# Altium PCB ZYNQ_BOARD.PcbDoc (part 8 of 9)
Units mm, origin at the board's own origin, x right, y up, seen from the top; angles counter-clockwise.
Board outline 120 x 66 mm, 10 copper layers (Top Layer, Internal Plane 1 (GND), Middle Layer 1, Middle Layer 2, Internal Plane 2 (+1.0V), Middle Layer 3, Middle Layer 4, Middle Layer 5 (PWR), Internal Plane 3 (GND), Bottom Layer), stack 0.982 mm thick; 333 components, 331 nets, 1511 pads, 1077 vias.
Unrouted connection lines stored in the file: 30.
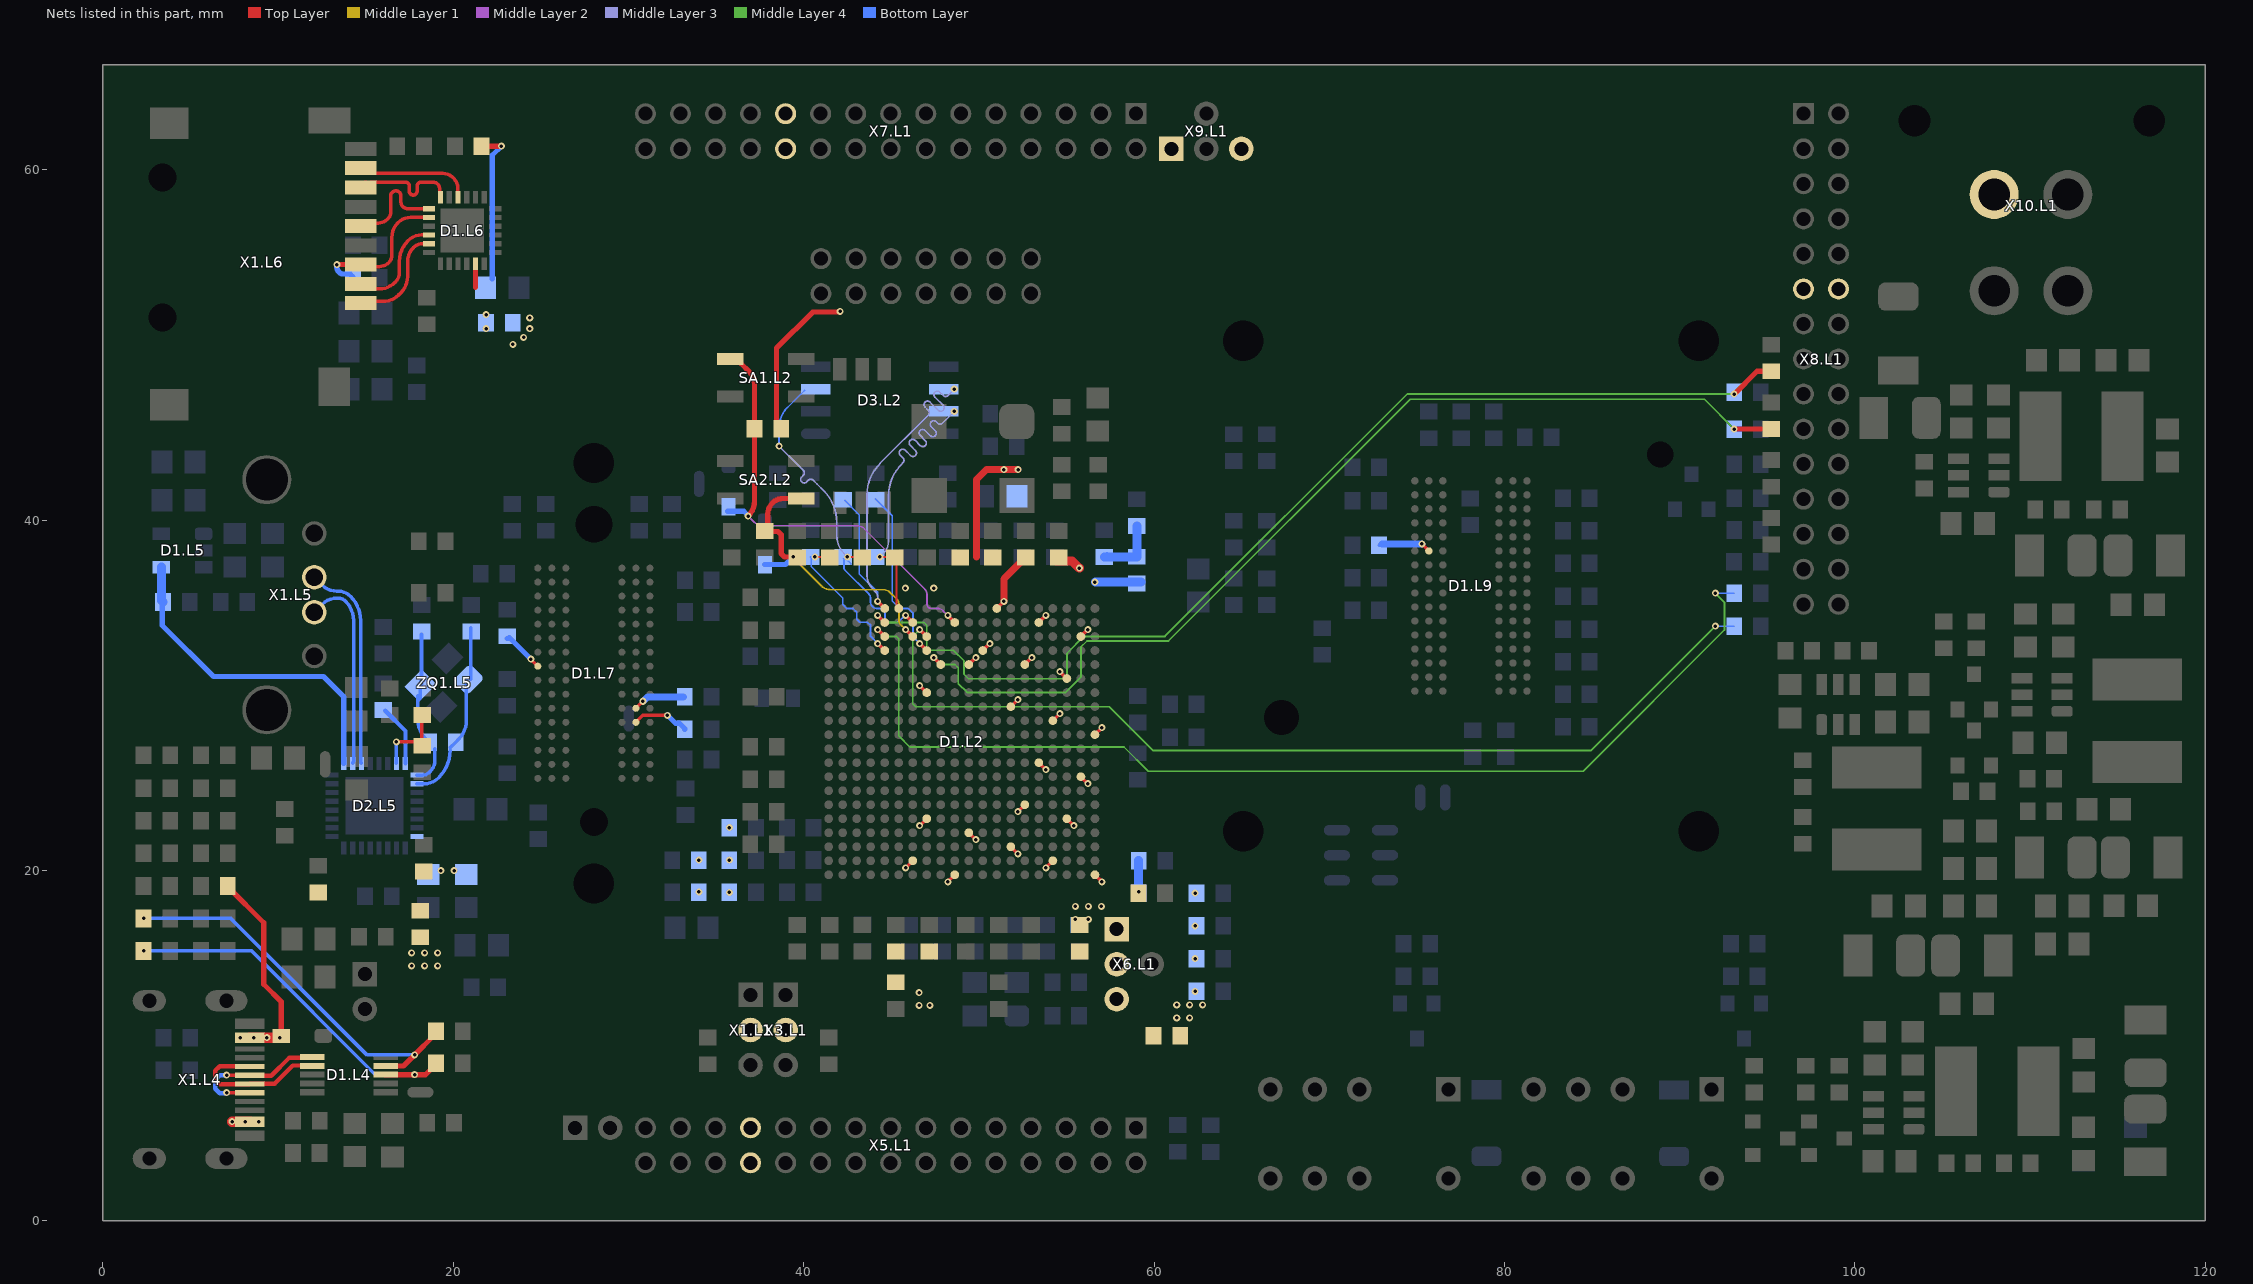
[diagram p16: the nets of this part, all layers, seen from the top]

## Via types
v1: diameter 0.4, hole 0.2, Top Layer to Bottom Layer, 1059 vias
v2: diameter 0.9, hole 0.6, Top Layer to Bottom Layer, 18 vias

## Nets (pads, with @x,y where several pads share a name; then routed paths per layer and width w, separated by ;. In a path a pad name is that pad's centre, name@x,y a point inside that pad or via, vN(x,y) a via of type N, cw(c..) or ccw(c..) an arc to the next point about the centre after c; other vN are vias at no path point) (continued)
PS_MIO4: D1.L2.B7 D3.L2.3 R21.L2.2 R25.L2.2 | length 20.2
  Top Layer w0.1: v1(42.49,37.9) R21.L2.2@43.35,37.9
  Top Layer w0.2: v1(45.82,34.56) D1.L2.B7@46.22,34.16
  Middle Layer 3 w0.1: v1(38.589,44.229) 39.658,43.16 39.976,42.842 cw(c39.834,42.701) 39.976,42.559 39.884,42.468 ccw(c40.026,42.326) 39.884,42.185 ccw(c40.026,42.326) 40.167,42.185 40.259,42.276 cw(c40.4,42.135) 40.542,42.276 40.754,42.064 41.143,41.675 cw(c39.347,39.879) 41.887,39.879 41.887,39.125 ccw(c43.387,39.125) 42.326,38.064 v1(42.49,37.9)
  Bottom Layer w0.1: v1@38.589,44.119 v1(38.589,44.229) 38.589,45.27 cw(c40.228,45.27) 39.069,46.429 D3.L2.3@40.04,47.4 ; R25.L2.2@42.25,37.8 42.4,37.8 R25.L2.2@42.7,37.5 ; R25.L2.2@42.3,37.7 42.3,37.28 ccw(c42.513,37.28) 42.362,37.129 43.73,35.762 cw(c43.524,35.555) 43.815,35.555 43.815,35.308 ccw(c44.138,35.308) 43.91,35.08 ccw(c44.2,35.37) 44.2,34.96 44.273,34.96 cw(c44.273,34.559) 44.556,34.843 ; 44.556,34.842 cw(c44.366,34.652) 44.635,34.652 ; 44.635,34.651 44.635,34.435 ccw(c44.925,34.435) 44.72,34.23 ccw(c44.889,34.399) 44.889,34.16 45.249,34.16 ccw(c45.249,34.459) 45.46,34.248 45.739,34.526 cw(c45.82,34.445) v1(45.82,34.56)
PS_MIO5: D1.L2.A6 D3.L2.7 R22.L2.2 R26.L2.2 | length 18.3
  Top Layer w0.1: v1(44.35,37.9) R22.L2.2@45.19,37.9 ; D1.L2.A6@45.29,34.92 R22.L2.2@45.29,37.85 ; D1.L2.A6@45.36,35.02 D1.L2.A6@45.42,34.96
  Middle Layer 3 w0.1: v1(44.35,37.9) 44.545,38.095 ccw(c43.832,38.808) 44.84,38.808 44.84,41.403 cw(c47.38,41.403) 45.584,43.199 45.625,43.24 45.66,43.275 ccw(c45.519,43.416) 45.66,43.558 45.512,43.706 cw(c45.653,43.847) 45.512,43.989 cw(c45.653,43.847) 45.795,43.989 46.09,43.693 ccw(c46.232,43.835) 46.373,43.693 ccw(c46.232,43.835) 46.373,43.976 46.078,44.272 cw(c46.219,44.413) 46.078,44.554 cw(c46.219,44.413) 46.36,44.554 46.656,44.259 ccw(c46.797,44.4) 46.939,44.259 ccw(c46.797,44.4) 46.939,44.542 46.643,44.837 cw(c46.785,44.979) 46.643,45.12 cw(c46.785,44.979) 46.926,45.12 47.222,44.825 ccw(c47.363,44.966) 47.504,44.825 ccw(c47.363,44.966) 47.504,45.107 47.28,45.332 cw(c47.421,45.474) 47.28,45.615 cw(c47.421,45.474) 47.563,45.615 47.64,45.538 ccw(c47.781,45.679) 47.923,45.538 48.274,45.889 v1(48.59,46.205)
PS_MIO6: D1.L2.A5 D3.L2.6 R27.L2.2 | length 24.1
  Top Layer w0.2: v1(44.22,35.36) D1.L2.A5@44.62,34.96
  Middle Layer 3 w0.1: 44.09,35.91 cw(c43.776,35.596) 44.22,35.596 v1(44.22,35.36) ; 44.09,35.91 43.923,36.077 cw(c44.677,36.831) 43.611,36.831 43.611,41.444 cw(c46.151,41.444) 44.355,43.24 47.071,45.956 47.107,45.992 ccw(c46.965,46.133) 47.107,46.274 46.924,46.458 cw(c47.065,46.599) 46.924,46.74 cw(c47.065,46.599) 47.206,46.74 47.672,46.274 ccw(c47.814,46.416) 47.955,46.274 ccw(c47.814,46.416) 47.955,46.557 47.489,47.023 cw(c47.631,47.165) 47.489,47.306 cw(c47.631,47.165) 47.772,47.306 47.955,47.123 ccw(c48.097,47.264) 48.238,47.123 48.456,47.341 v1(48.59,47.475)
  Bottom Layer w0.1: R27.L2.2@42.335,41.133 43.17,40.298 43.17,36.929 44.22,35.879 v1(44.22,35.36)
PS_MIO7: D1.L2.D8 R28.L2.2 | length 10.2
  Top Layer w0.2: v1(46.62,32.96) D1.L2.D8@47.02,32.56
  Bottom Layer w0.1: R28.L2.2@44.084,41.226 45.05,40.26 45.05,35.39 45.48,34.96 45.97,34.96 46.23,34.7 46.23,33.35 v1(46.62,32.96)
PS_MIO8: D1.L2.D5 R20.L2.2 R29.L2.2 | length 8.5
  Top Layer w0.1: v1(40.63,37.9) R20.L2.2@41.49,37.9
  Top Layer w0.2: v1(44.22,32.96) D1.L2.D5@44.62,32.56
  Bottom Layer w0.1: R29.L2.2@40.44,37.9 R29.L2.2@40.39,37.9 40.43,37.86 40.43,37.359 42.227,35.561 42.227,35.193 42.46,34.96 42.81,34.96 43.02,34.75 43.02,34.355 43.195,34.18 43.63,34.18 43.815,33.995 43.815,33.365 v1(44.22,32.96)
PS_MIO9: D1.L2.B5 R3.L2.2 R4.L2.2 | length 62.7
  Top Layer w0.2: v1(44.22,34.56) D1.L2.B5@44.62,34.16
  Top Layer w0.3: v1@93.12,47.2 94.42,48.5 R4.L2.2@95.21,48.5 ; R4.L2.2@94.97,48.46 R4.L2.2@95.02,48.46
  Middle Layer 4 w0.1: v1(44.22,34.56) 44.618,34.162 46.872,34.162 47.027,34.007 47.027,32.729 47.186,32.57 48.541,32.57 49.145,31.966 49.145,31.21 49.406,30.949 54.804,30.949 55.023,31.168 55.023,32.408 55.982,33.366 60.615,33.366 74.449,47.2 v1(93.11,47.2)
  Bottom Layer w0.3: v1(93.11,47.2) R3.L2.2@93.41,47.5
PS_MIO10: D1.L2.E9 R5.L2.2 R6.L2.2 | length 58.4
  Top Layer w0.2: v1(47.42,32.16) D1.L2.E9@47.82,31.76
  Top Layer w0.3: v1(93.11,45.2) 95.207,45.2 R6.L2.2@95.21,45.202
  Middle Layer 4 w0.1: v1(47.42,32.16) 47.42,32.158 47.818,31.76 48.63,31.76 48.82,31.57 48.82,30.67 49.322,30.168 54.955,30.168 55.82,31.033 55.82,32.76 56.166,33.106 60.816,33.106 74.607,46.897 91.413,46.897 v1(93.11,45.2)
  Bottom Layer w0.3: R5.L2.2@93.077,45.233 v1(93.11,45.2)
PS_MIO14: D1.L2.C5 R9.L2.2 | length 62.2
  Top Layer w0.2: v1(44.22,33.76) D1.L2.C5@44.62,33.36
  Middle Layer 4 w0.1: v1(44.22,33.76) 44.619,33.361 45.287,33.361 45.417,33.231 45.417,27.688 46.053,27.052 58.279,27.052 59.668,25.663 84.484,25.663 92.55,33.729 92.55,35.314 v1(92.03,35.834)
  Bottom Layer w0.1: v1@92.052,35.83 R9.L2.2@93.11,35.83
PS_MIO15: D1.L2.C8 R10.L2.2 | length 55.9
  Top Layer w0.2: v1(46.62,33.76) D1.L2.C8@47.02,33.36
  Middle Layer 4 w0.1: v1(46.62,33.76) 46.224,33.364 46.224,29.516 46.391,29.348 57.447,29.348 59.947,26.848 84.928,26.848 92.03,33.95 v1(92.03,33.954)
  Bottom Layer w0.1: v1@92.052,33.95 R10.L2.2@93.11,33.95
PS_MIO_VREF_501: C12.L2.1 D1.L2.E11 R13.L2.1 R14.L2.1 | length 4.4
  Top Layer w0.2: D1.L2.E11@49.42,31.76 v1(49.82,32.16)
  Bottom Layer w0.3: R14.L2.1@57.159,37.9 R14.L2.1@57.171,37.9 ; R14.L2.1@57.209,37.9 R14.L2.1@57.171,37.9 ; R14.L2.1@57.313,38.042 57.176,37.905 R14.L2.1@57.171,37.9
  Bottom Layer w0.508: R14.L2.1@57.159,37.9 57.165,37.905 57.176,37.905 59.015,37.905 R13.L2.1@59.02,37.91 ; R13.L2.1@59.02,37.91 C12.L2.1@59.02,39.672
PS_POR_B: C11.L2.1 D1.L2.C7 R16.L2.1 SA2.L2.3 VD1.L2.1 | length 17.8
  Top Layer w0.2: v1(45.82,33.76) D1.L2.C7@46.22,33.36
  Top Layer w0.3: C11.L2.1@37.76,39.39 37.802,39.349 38.534,39.349 38.71,39.173 38.71,38.096 38.906,37.9 39.6,37.9 R16.L2.1@39.63,37.87 ; C11.L2.1@37.95,39.42 37.95,40.344 cw(c38.864,40.344) 38.218,40.99 cw(c38.809,40.399) 38.809,41.235 SA2.L2.3@39.855,41.235 SA2.L2.3@40.045,41.235
  Middle Layer 1 w0.1: v1(39.39,37.9) ccw(c39.495,37.9) 39.421,37.826 40.966,36.281 ccw(c41.576,36.891) 41.576,36.028 44.574,36.028 cw(c44.575,35.551) 44.912,35.888 44.913,35.887 45.3,35.5 cw(c44.971,35.171) 45.436,35.171 45.436,34.635 ; 45.436,34.634 45.436,34.252 ccw(c45.698,34.252) 45.513,34.067 v1(45.82,33.76)
  Bottom Layer w0.3: VD1.L2.1@37.774,37.47 38.95,37.47 39.38,37.9 v1(39.39,37.9)
PS_SRST_B_501: D1.L2.B10 R15.L2.1 SA1.L2.3 VD2.L2.1 | length 25.7
  Top Layer w0.2: v1(48.22,34.56) D1.L2.B10@48.62,34.16
  Top Layer w0.3: SA1.L2.3@35.805,49.205 cw(c35.805,48.36) 36.402,48.958 36.91,48.45 cw(c36.234,47.774) 37.19,47.774 R15.L2.1@37.19,45.21 37.19,41.099 cw(c35.961,41.099) v1(36.83,40.23)
  Middle Layer 2 w0.1: v1(36.83,40.23) 37.154,39.906 ccw(c37.685,40.438) 37.685,39.686 43.02,39.686 cw(c43.02,39.049) 43.47,39.5 46.92,36.05 cw(c46.653,35.783) 47.031,35.783 47.031,35.215 ccw(c47.277,35.215) 47.102,35.041 ccw(c47.297,35.235) 47.297,34.96 ; 47.298,34.96 47.648,34.96 cw(c47.648,34.545) 47.941,34.839 v1(48.22,34.56)
  Bottom Layer w0.3: VD2.L2.1@35.665,40.512 36.575,40.512 36.83,40.257 v1(36.83,40.23)
PWR_B13_FPGA: C25.L2.1 C28.L2.1 C31.L2.1 D1.L2.T8 D1.L2.U11 D1.L2.W7 D1.L2.Y10 X3.L1.2 X5.L1.23 X5.L1.24 | length 2.3
  Top Layer w0.2: v1(45.82,20.16) D1.L2.W7@46.22,20.56 ; v1(46.62,22.56) D1.L2.T8@47.02,22.96 ; v1(48.22,19.36) D1.L2.Y10@48.62,19.76 ; D1.L2.U11@49.42,22.16 v1(49.82,21.76)
  other v1: 46.58,12.308 47.195,12.308 46.58,13.03
PWR_B34_FPGA: C34.L2.1 C36.L2.1 C38.L2.1 C40.L2.1 D1.L2.N19 D1.L2.R15 D1.L2.T18 D1.L2.V14 D1.L2.W17 D1.L2.Y20 R1.L1.1 | length 5.2
  Top Layer w0.2: D1.L2.V14@51.82,21.36 v1(52.22,20.96) ; v1(52.22,23.36) D1.L2.R15@52.62,23.76 ; v1(53.82,20.16) D1.L2.W17@54.22,20.56 ; D1.L2.T18@55.02,22.96 v1(55.42,22.56) ; D1.L2.N19@55.82,25.36 v1(56.22,24.96) ; D1.L2.Y20@56.62,19.76 v1(57.02,19.36)
  Bottom Layer w0.508: v1(59.116,18.784) C36.L2.1@59.116,20.57
  other v1: 55.51,17.22 56.25,17.22 55.51,17.96 56.25,17.96 56.99,17.96
PWR_B35_FPGA: C43.L2.1 C46.L2.1 C48.L2.1 C50.L2.1 D1.L2.C19 D1.L2.F18 D1.L2.H14 D1.L2.J17 D1.L2.K20 D1.L2.M16 R2.L1.1 | length 3.4
  Top Layer w0.2: D1.L2.H14@51.82,29.36 v1(52.22,29.76) ; D1.L2.M16@53.42,26.16 v1(53.82,25.76) ; D1.L2.J17@54.22,28.56 v1(54.62,28.96) ; v1(54.62,31.36) D1.L2.F18@55.02,30.96 ; D1.L2.C19@55.82,33.36 v1(56.22,33.76) ; D1.L2.K20@56.62,27.76 v1(57.02,28.16)
  other v1: 61.29,11.592 62.03,11.592 61.29,12.333 62.03,12.333 62.77,12.333 62.34,13.111 62.34,14.98 62.34,16.84 62.34,18.71
PWR_B501_FPGA: C26.L2.1 C29.L2.1 D1.L2.A13 D1.L2.B16 D1.L2.D12 D1.L2.E15 R1.L5.1 R2.L6.1 R13.L2.2 R15.L2.2 X1.L1.2 X7.L1.21 X7.L1.22 | length 19
  Top Layer w0.2: D1.L2.D12@50.22,32.56 v1(50.62,32.96) ; D1.L2.A13@51.02,34.96 v1(51.42,35.36) ; D1.L2.E15@52.62,31.76 v1(53.02,32.16) ; D1.L2.B16@53.42,34.16 v1(53.82,34.56) ; C29.L2.1@54.55,37.87 54.753,37.667 C29.L2.1@54.9,37.52 ; v1@55.683,37.26 55.733,37.26 v1(55.737,37.26)
  Top Layer w0.3: R15.L2.2@38.45,45.21 38.45,49.82 40.518,51.888 v1@42.088,51.888 ; v1@42.064,51.908 v1(42.075,51.919)
  Top Layer w0.4: v1(51.42,35.36) 51.42,36.656 C26.L2.1@52.618,37.855
  Top Layer w0.508: C29.L2.1@54.461,37.667 54.753,37.667 55.327,37.667 v1@55.733,37.26
  Bottom Layer w0.508: v1@56.65,36.467 R13.L2.2@59.249,36.467
  other v1: 17.617,14.566 18.357,14.566 19.097,14.566 17.617,15.306 18.357,15.306 19.097,15.306 56.614,36.468 23.4,50.04 24.004,50.436 24.36,50.93 24.36,51.545
PWR_BANK3435: R1.L1.2 R2.L1.2 X6.L1.3
PWR_RAM_EXT: X6.L1.1 X9.L1.1 X10.L1.2
PWR_RAM_FORM: X6.L1.5 X8.L1.11 X8.L1.12 X9.L1.5
SD_CLK_B0: D1.L6.19 X1.L6.5 | length 6
  Top Layer w0.2: X1.L6.5@14.725,56.96 15.72,56.96 ccw(c15.72,57.678) 16.227,57.17 16.28,57.223 ccw(c15.942,57.561) 16.42,57.561 16.42,58.5 cw(c16.72,58.5) 16.72,58.8 cw(c16.72,58.511) 17.009,58.511 17.009,58.157 ccw(c17.386,58.157) 17.386,57.78 D1.L6.19@18.61,57.78
SD_CMD_B0: D1.L6.20 R4.L6.1 X1.L6.3 | length 8.7
  Top Layer w0.2: X1.L6.3@14.725,54.59 ccw(c14.991,54.856) 14.991,54.48 15.78,54.48 ccw(c15.78,55.235) 16.313,54.7 ccw(c15.897,55.118) 16.486,55.118 16.486,56.136 cw(c17.681,56.136) 16.838,56.983 cw(c17.559,56.258) 17.559,57.28 D1.L6.20@18.61,57.28
  Top Layer w0.3: v1(13.35,54.59) X1.L6.3@14.725,54.59
  Bottom Layer w0.3: v1(13.35,54.59) 13.35,54.444 ccw(c13.756,54.444) 13.469,54.157 ccw(c13.724,54.411) 13.724,54.051 R4.L6.1@14.135,54.051 ; R4.L6.1@14.114,54.03 14.265,53.88 R4.L6.1@14.265,53.83
SD_D0_B0: D1.L6.18 X1.L6.7 | length 6.7
  Top Layer w0.2: X1.L6.7@14.725,58.99 cw(c15.449,58.266) 15.449,59.29 16.708,59.29 17.258,59.29 cw(c17.258,59.065) 17.483,59.065 17.483,58.782 ccw(c17.708,58.782) 17.708,58.557 ccw(c17.708,58.782) 17.933,58.782 17.933,59.065 cw(c18.158,59.065) 18.158,59.29 18.79,59.29 18.844,59.29 cw(c18.844,58.914) 19.11,59.18 cw(c18.869,58.939) 19.21,58.939 19.21,58.551 ccw(c19.381,58.551) D1.L6.18@19.26,58.43
  Top Layer w0.3: X1.L6.7@14.725,58.99 X1.L6.7@14.965,59.23
SD_D1_B0: D1.L6.16 X1.L6.8 | length 6.6
  Top Layer w0.2: X1.L6.8@14.725,60.09 15.016,59.799 19.382,59.799 cw(c19.382,58.92) 20.26,58.951 20.26,58.947 D1.L6.16@20.26,58.43
SD_D2_B0: D1.L6.23 X1.L6.1 | length 6.7
  Top Layer w0.2: X1.L6.1@15.208,52.59 ccw(c15.208,51.907) X1.L6.1@14.725,52.39 14.818,52.483 14.841,52.483 15.983,52.483 15.984,52.483 ccw(c15.984,53.733) 16.869,52.85 17.009,52.99 ccw(c16.099,53.9) 17.386,53.9 17.386,54.754 cw(c18.526,54.754) 17.72,55.56 cw(c18.251,55.029) 18.251,55.78 D1.L6.23@18.61,55.78
SD_D3_B0: D1.L6.22 X1.L6.2 | length 6
  Top Layer w0.2: X1.L6.2@14.725,53.49 ccw(c15.417,54.182) 15.417,53.203 15.758,53.203 ccw(c15.758,54.529) 16.693,53.589 ; 16.693,53.59 ccw(c16.145,54.138) 16.92,54.138 16.92,54.139 16.92,54.779 16.92,54.78 cw(c18.574,54.78) 17.407,55.952 cw(c18.202,55.152) 18.202,56.28 D1.L6.22@18.61,56.28
SD_IO_PWR: C1.L6.1 D1.L6.5 R2.L6.2 R5.L6.1 | length 10.5
  Top Layer w0.3: 21.26,53.29 D1.L6.5@21.26,54.63 D1.L6.5@21.26,54.82 ; R5.L6.1@21.61,61.35 v1(22.738,61.35)
  Bottom Layer w0.3: C1.L6.1@22.22,53.76 22.22,60.832 v1(22.738,61.35)
  other v1: 21.87,50.93 21.87,51.73
UART_RX_LED: D1.L4.9 R8.L4.1 VD4.L4.2 | length 22.2
  Top Layer w0.3: D1.L4.9@16.14,8.85 17.157,8.85 v1(17.784,9.477) R8.L4.1@18.911,10.605
  Bottom Layer w0.2: v1(2.32,17.265) 7.285,17.265 15.073,9.477 v1(17.784,9.477)
UART_TX_LED: D1.L4.8 R7.L4.1 VD3.L4.2 | length 21.5
  Top Layer w0.3: D1.L4.8@16.14,8.35 v1(17.784,8.35) 18.41,8.35 R7.L4.1@19.01,8.95
  Bottom Layer w0.2: v1(2.32,15.41) 8.49,15.41 15.55,8.35 v1(17.784,8.35)
USB_HT_CPEN: D1.L5.4 D2.L5.17 R15.L5.1 | length 19.2
  Bottom Layer w0.3: R15.L5.1@3.385,35.33 3.385,33.995 6.308,31.072 12.578,31.072 13.75,29.9 D2.L5.17@13.75,26.12
  Bottom Layer w0.508: D1.L5.4@3.34,37.32 3.34,35.42 R15.L5.1@3.43,35.33
USB_HT_D_N: D2.L5.19 X1.L5.2 | length 12.1
  Bottom Layer w0.2: X1.L5.2@12.06,36.745 12.514,36.291 ccw(c13.35,37.128) 13.35,35.945 13.443,35.945 cw(c13.443,34.986) 14.122,35.664 14.124,35.662 cw(c12.733,34.271) 14.7,34.271 14.7,26.241 ccw(c14.871,26.241) D2.L5.19@14.75,26.12
USB_HT_D_P: D2.L5.18 X1.L5.3 | length 11.5
  Bottom Layer w0.2: X1.L5.3@12.06,34.745 12.514,35.199 cw(c13.35,34.362) 13.35,35.545 13.442,35.545 cw(c13.442,34.982) 13.84,35.38 cw(c12.729,34.269) 14.3,34.269 14.3,26.241 cw(c14.129,26.241) D2.L5.18@14.25,26.12
USB_HT_ID: D2.L5.23 R12.L5.1 R13.L5.1 | length 4.2
  Top Layer w0.2: v1(16.75,27.35) R13.L5.1@18.01,27.35 ; R13.L5.1@18.2,27.13 R12.L5.1@18.2,28.879
  Bottom Layer w0.2: D2.L5.23@16.75,26.12 v1(16.75,27.35)
USB_HT_RBIAS: D2.L5.24 R6.L5.1 | length 3.5
  Bottom Layer w0.25: R6.L5.1@16.112,29.129 17.27,27.97 D2.L5.24@17.27,26.12
USB_HT_XT1: C14.L5.1 D2.L5.25 R11.L5.2 ZQ1.L5.3 | length 8.9
  Bottom Layer w0.2: D2.L5.25@17.92,25.45 18.22,25.45 ccw(c18.22,26.084) 18.667,25.635 ccw(c18.002,26.302) 18.944,26.302 R11.L5.2@18.944,26.961 ; ZQ1.L5.3@17.98,29.975 17.98,28.596 ccw(c19.516,28.596) 18.43,27.51 R11.L5.2@18.61,27.33 ; ZQ1.L5.3@18.02,29.755 18.111,29.846 ZQ1.L5.3@18.111,30.553 ZQ1.L5.3@18.181,30.623 ; ZQ1.L5.3@18.181,30.553 ZQ1.L5.3@18.181,30.623 ; C14.L5.1@18.181,33.5 ZQ1.L5.3@18.181,30.623
USB_HT_XT2: C13.L5.1 D2.L5.26 R11.L5.1 ZQ1.L5.1 | length 10.2
  Bottom Layer w0.2: D2.L5.26@17.92,24.95 18.314,24.95 ; 18.315,24.95 ccw(c18.315,26.153) 19.165,25.301 ccw(c17.609,26.859) R11.L5.1@19.81,26.859 ; R11.L5.1@19.81,27.01 R11.L5.1@20.13,27.33 20.291,27.491 ccw(c19.186,28.596) 20.749,28.596 ZQ1.L5.1@20.749,30.907 ; ZQ1.L5.1@20.999,30.907 C13.L5.1@20.999,33.854
USB_PWR_IN: R9.L4.1 VD1.L4.1 X1.L4.2 X1.L4.11 | length 12.6
  Top Layer w0.3: R9.L4.1@7.17,19.03 9.18,17.02 9.18,13.509 10.18,12.509 VD1.L4.1@10.18,10.57
  Top Layer w0.6: v1(7.37,5.67) X1.L4.2@8.375,5.67 ; X1.L4.11@8.375,10.47 v1(8.6,10.47) v1(9.35,10.47) 10.08,10.47 VD1.L4.1@10.18,10.57
  other v1: 8.13,5.67 8.88,5.67 7.84,10.47 10.1,10.47
USB_UART_D_N: D1.L4.2 X1.L4.6 X1.L4.8 | length 8.7
  Top Layer w0.254: X1.L4.8@8.355,8.84 X1.L4.8@8.357,8.838 ; X1.L4.8@8.375,8.82 X1.L4.8@8.357,8.838 ; D1.L4.2@11.94,8.85 11.917,8.873 10.83,8.873 9.8,7.843 8.398,7.843 X1.L4.6@8.375,7.82 8.357,7.802 6.661,7.802 6.4,8.064 6.4,8.576 6.661,8.838 X1.L4.8@8.357,8.838
USB_UART_D_P: D1.L4.1 X1.L4.5 X1.L4.7 | length 7.5
  Top Layer w0.2: v1(7.06,7.32) X1.L4.5@7.77,7.32 ; v1(7.06,8.32) X1.L4.7@7.77,8.32
  Top Layer w0.254: X1.L4.7@8.375,8.32 8.398,8.297 9.612,8.297 10.642,9.327 11.917,9.327 D1.L4.1@11.94,9.35
  Bottom Layer w0.254: v1@7.06,7.285 6.664,7.285 6.403,7.546 6.403,8.059 6.664,8.32 v1(7.06,8.32) v1@7.07,8.32
USB_VDDIO_PWR: C4.L5.1 C5.L5.1 D2.L5.32 R1.L5.2 R7.L5.2 R10.L5.2
  other v1: 19.29,19.991 20.05,19.991
VCC_PLL: C15.L2.1 C16.L2.1 D1.L2.G8 L1.L2.2 | length 7.6
  Top Layer w0.2: v1(46.62,30.56) D1.L2.G8@47.02,30.16
  Top Layer w0.4: 49.866,37.9 49.866,42.316 50.438,42.888 v1@52.232,42.888
  other v1: 45.796,36.119 47.42,36.119 51.42,42.882 52.232,42.887
VREF_DDR_M: C14.L7.2 C15.L7.1 C16.L7.1 C17.L7.1 D1.L7.H1 D1.L7.M8 R4.L7.1 R5.L7.2 R6.L7.2 | length 5.7
  Top Layer w0.2: v1(24.42,32.065) D1.L7.H1@24.82,31.665 ; D1.L7.M8@30.42,28.465 30.82,28.865 v1(32.22,28.865)
  Bottom Layer w0.3: C16.L7.1@23.069,33.25 C16.L7.1@23.119,33.25 ; C16.L7.1@23.189,33.299 24.414,32.074 v1(24.42,32.065) v1(24.42,32.065) ; v1(32.22,28.865) 32.675,28.41 32.91,28.41 33.21,28.11 C17.L7.1@33.21,28.06
  other v1: 35.75,18.75 34.01,18.78 34.01,20.6 35.75,20.6 35.75,22.453
ZQ_DDR: D1.L9.L8 R3.L9.2 | length 3
  Top Layer w0.2: v1(75.28,38.645) D1.L9.L8@75.68,38.245
  Bottom Layer w0.2: R3.L9.2@72.84,38.58 cw(c72.997,38.423) R3.L9.2@72.997,38.645
  Bottom Layer w0.4: R3.L9.2@72.997,38.645 v1(75.28,38.645)
ZQ_DDR_M: D1.L7.L8 R3.L7.2 | length 3
  Top Layer w0.2: D1.L7.L8@30.42,29.265 v1(30.82,29.665)
  Bottom Layer w0.3: v1@30.82,29.705 v1@30.889,29.705
  Bottom Layer w0.4: v1@30.889,29.705 31.084,29.9 R3.L7.2@33.142,29.9
pads on no net: D1.L2.G14 D1.L2.G18 D1.L2.G19 D1.L2.G20 D1.L2.H15 D1.L2.H17 D1.L2.H18 D1.L2.H20 D1.L2.J15 D1.L2.J16 D1.L2.K16 D1.L2.L14 D1.L2.L15 D1.L2.M14 D1.L2.M15 D1.L2.N17 D1.L2.P1 D1.L2.P3 D1.L2.P14 D1.L2.P15 D1.L2.P16 D1.L2.P18 D1.L2.R1 D1.L2.R2 D1.L2.R3 D1.L2.R16 D1.L2.R19 D1.L2.T1 D1.L2.T2 D1.L2.T4 D1.L2.T10 D1.L2.T11 D1.L2.T12 D1.L2.T14 D1.L2.T15 D1.L2.T19 D1.L2.U2 D1.L2.U3 D1.L2.U4 D1.L2.U12 D1.L2.U13 D1.L2.V1 D1.L2.V2 D1.L2.V3 D1.L2.V12 D1.L2.V13 D1.L2.W1 D1.L2.W3 D1.L2.W4 D1.L2.W5 D1.L2.W13 D1.L2.W16 D1.L2.W18 D1.L2.W19 D1.L2.Y1 D1.L2.Y2 D1.L2.Y3 D1.L2.Y4 D1.L4.4 D1.L4.5 D1.L6.8 D1.L6.10 D1.L6.12 D1.L6.13 D1.L6.14 D1.L6.15 D1.L7.0 D1.L7.J1 D1.L7.J9 D1.L7.L1 D1.L7.L9 D1.L9.0 D1.L9.J1 D1.L9.J9 D1.L9.L1 D1.L9.L9 D2.L5.12 D2.L5.15 D2.L5.16 K1.L8.3 K1.L8.10 K2.L8.3 K2.L8.10 SA1.L2.1 SA1.L2.2 SA2.L2.1 SA2.L2.2 X1.L6.0 X4.L1.12 X4.L1.14 X5.L1.21 X5.L1.22 X6.L1.2 X6.L1.6 X7.L1.19 X7.L1.20 X8.L1.13 X8.L1.14 X8.L1.15 X9.L1.2 X9.L1.6 X10.L1.0

## Polygon pours and split planes (outlines as drawn)
MEM1_BUS.VREF_FPGA on Bottom Layer "NONET_L-01_P-001" (solid, pour order 212): 64.01,38.88 64.01,36.21 64.04,36.18 66.931,36.18 69.586,36.18 69.792,36.386 69.792,37.348 69.51,37.63 67.45,37.63 66.997,38.083 66.997,38.883 66.94,38.94 64.07,38.94
+5V_RELE on Bottom Layer "NONET_L-01_P-001" (solid, pour order 189): 44 vertices, not listed, extent 1.07,11.11 109.66,64.26
+3.3V_DCDC on Bottom Layer "NONET_L-01_P-001" (solid, pour order 281): 17.44,48.38 18.846,48.38 19.148,48.077 19.148,46.782 19.351,46.579 19.879,46.579 20.09,46.79 20.09,48.93 19.74,49.28 17.44,49.28
GND on Bottom Layer "NONET_L-01_P-001" (solid, pour order 257): 27 vertices, not listed, extent 39.833,38.969 53.783,53.78
NetD1.L2_F11 on Bottom Layer "NONET_L-01_P-001" (solid, pour order 280): 49.631,31.695 49.977,31.695 50.169,31.503 50.169,31.179 50.025,31.035 49.601,31.035 48.939,31.698 48.939,36.68 50.255,37.997 50.465,37.788 50.465,37.508 49.427,36.47 49.427,31.899
NetD1.L2_J9 on Bottom Layer "NONET_L-01_P-001" (solid, pour order 279): 46.988,31.575 47.215,31.803 47.733,31.803 47.784,31.854 47.784,37.759 47.874,37.85 48.38,37.85 48.72,37.51 48.72,29.629 47.785,28.695 47.302,28.695 46.988,29.008
GND on Bottom Layer "NONET_L-01_P-001" (solid, pour order 275): 20 vertices, not listed, extent 4.604,35.539 9.377,43.95
GND on Bottom Layer "NONET_L-01_P-001" (solid, pour order 268): 45 vertices, not listed, extent 21.109,17 41.666,46.017
PS_DDR_VRP on Bottom Layer "NONET_L-01_P-001" (solid, pour order 270): 44.538,29.888 44.538,29.61 44.237,29.31 39.01,29.31 39.01,30.329 40.44,30.329 40.566,30.202 43.745,30.202 43.921,30.026 44.399,30.026
PS_DDR_VRN on Bottom Layer "NONET_L-01_P-001" (solid, pour order 271): 38.047,32.724 39.224,32.724 39.339,32.608 44.455,32.608 44.658,32.405 44.658,30.503 44.415,30.26 44.039,30.26 43.783,30.516 43.783,31.555 43.613,31.725 38.047,31.725
PS_MIO_VREF_501 on Bottom Layer "NONET_L-01_P-001" (solid, pour order 269): 19 vertices, not listed, extent 49.597,31.708 57.148,37.86
GND on Bottom Layer "NONET_L-01_P-001" (solid, pour order 266): 19 vertices, not listed, extent 15.492,32.245 21.507,37.97
GND on Bottom Layer "NONET_L-01_P-001" (solid, pour order 252): 19 vertices, not listed, extent 49.256,38.975 55.579,48.738
GND on Bottom Layer "NONET_L-01_P-001" (solid, pour order 263): 43.466,9.834 44.4,8.9 48.309,8.9 50.465,11.055 50.465,12.313 49.049,12.313 47.436,10.7 45.09,10.7 44.556,11.234 44.556,12.875 44.165,13.267 43.833,13.267 43.466,12.9
GND on Bottom Layer "NONET_L-01_P-001" (solid, pour order 262): 36.822,21.096 36.822,18.21 36.002,17.39 33.93,17.39 33.93,16.092 36.297,16.092 37.718,17.513 37.718,21.096
+1.35V_RAM_PS on Bottom Layer "NONET_L-01_P-001" (solid, pour order 210): 32.043,21.135 32.943,21.135 32.98,21.097 32.98,17.85 33.35,17.48 33.35,13.475 33.142,13.267 31.253,13.267 31.062,13.458 31.062,15.587 32.007,16.532 32.004,21.096
VCC_PLL on Bottom Layer "NONET_L-01_P-001" (solid, pour order 248): 51.559,41.71 52.759,41.705 52.759,42.791 52.395,43.154 51.301,43.154 51.15,43.004 51.15,42.759 51.559,42.35
+1.8V_DCDC on Bottom Layer "NONET_L-01_P-001" (solid, pour order 245): 47.7,39.89 47.7,38.951 51.105,38.951 51.105,42.385 50.88,42.61 50.88,43.165 51.105,43.39 51.105,46.561 51.092,46.575 50.125,46.575 49.567,46.017 49.567,40.572 48.885,39.89
PWR_B13_FPGA on Bottom Layer "NONET_L-01_P-001" (solid, pour order 233): 21 vertices, not listed, extent 36.055,2.47 41.63,11.776
PWR_B501_FPGA on Bottom Layer "NONET_L-01_P-001" (solid, pour order 220): 22.93,51.837 22.93,50 23.17,49.76 23.71,49.76 24.61,50.66 24.61,51.71 24.345,51.975 23.06,51.975
GND on Bottom Layer "NONET_L-01_P-001" (solid, pour order 219): 56.662,38.975 56.66,40.645 58.24,42.225 59.808,43.793 61.548,43.793 61.914,43.427 61.914,42.958 61.601,42.645 60.503,42.645 59.589,41.732 59.589,40.786 59.548,40.745 58.413,40.745 57.659,39.991 57.659,38.989
GND on Bottom Layer "NONET_L-01_P-001" (solid, pour order 218): 17 vertices, not listed, extent 61.865,34.37 71.77,45.97
PWR_B34_FPGA on Bottom Layer "NONET_L-01_P-001" (solid, pour order 215): 55.233,18.022 55.415,18.204 57.087,18.2 57.221,18.066 57.221,17.847 56.128,16.758 55.233,16.758
+1.35V_RAM_PL on Bottom Layer "NONET_L-01_P-001" (solid, pour order 211): 66.99,34.739 66.921,34.67 61.884,34.67 61.36,34.67 60.65,33.96 60.331,33.96 60.19,34.101 60.19,34.431 61.718,35.958 63.505,35.958 63.843,35.621 66.95,35.621 66.99,35.581
MEM1_BUS.VREF_FPGA on Bottom Layer "NONET_L-01_P-001" (solid, pour order 209): 61.96,30.001 61.96,27.25 62.107,27.103 63.145,27.103 63.812,27.77 63.812,29.348 63.1,30.06 62.019,30.06
PL_DDR_B34_VREF on Bottom Layer "NONET_L-01_P-001" (solid, pour order 208): 27 vertices, not listed, extent 51.97,23.916 61.399,28.174
PL_DDR_B35_VREF on Bottom Layer "NONET_L-01_P-001" (solid, pour order 207): 19 vertices, not listed, extent 52.62,27.967 61.412,30.98
VREF_DDR_M on Bottom Layer "NONET_L-01_P-001" (solid, pour order 206): 33.56,21.12 33.56,18.21 33.62,18.15 36.19,18.15 36.25,18.21 36.25,22.97 36.208,23.012 35.302,23.012 35.25,22.96 35.25,21.63 34.796,21.176 33.616,21.176
SD_IO_PWR on Bottom Layer "NONET_L-01_P-001" (solid, pour order 203): 21.243,53.32 21.243,50.817 21.49,50.57 22.31,50.57 22.437,50.697 22.437,53.253 22.37,53.32
GND on Bottom Layer "NONET_L-01_P-001" (solid, pour order 202): 19.533,57.78 19.26,57.507 19.26,55.28 21.77,55.28 21.77,57.78
+1.8V_DCDC on Bottom Layer "NONET_L-01_P-001" (solid, pour order 200): 21.493,13.848 21.493,12.523 21.28,12.31 18.18,12.31 17.985,12.505 17.985,13.625 18.208,13.848
+1.8V_USB_OTG on Bottom Layer "NONET_L-01_P-001" (solid, pour order 193): 25 vertices, not listed, extent 18.13,12.31 23.19,24.557
USB_VDDIO_PWR on Bottom Layer "NONET_L-01_P-001" (solid, pour order 191): 17.55,22.094 17.55,21.79 17.92,21.42 17.92,19.17 18.05,19.04 21.25,19.04 21.46,19.25 21.46,20.42 20.97,20.91 19.74,20.91 18.556,22.094
+5V_MAIN on Bottom Layer "NONET_L-01_P-001" (solid, pour order 188): 96.62,9.54 96.89,9.27 99.4,9.27 100.165,10.035 100.165,22.945 108.43,31.21 108.43,38.08 107.93,38.58 106.01,38.58 105.47,38.04 105.47,33.32 97.853,25.703 97.853,11.833 96.62,10.6
USB_PWR_IN on Bottom Layer "NONET_L-01_P-001" (solid, pour order 172): 6.99,5.44 7.17,5.26 9.1,5.26 9.32,5.48 9.32,8.66 10.56,9.9 10.56,10.63 10.349,10.841 7.511,10.841 7.38,10.71 7.38,10.3 7.63,10.05 7.63,6.53 6.99,5.89
+3.3V_SD_PWR on Bottom Layer "NONET_L-01_P-001" (solid, pour order 167): 15.34,46.84 18.41,46.84 18.41,47.775 17.155,47.775 16.55,48.38 16.55,55.376 20.21,59.036 20.21,59.37 19.91,59.67 18.703,59.67 15.34,56.307
+5V_MAIN on Top Layer "NONET_L-01_P-001" (solid, pour order 175): 62 vertices, not listed, extent 99.71,27.73 112.591,49.36
GND on Top Layer "NONET_L-01_P-001" (solid, pour order 276): 29 vertices, not listed, extent 39.13,8.95 51.56,15.83
GND on Top Layer "NONET_L-01_P-001" (solid, pour order 264): 21 vertices, not listed, extent 33.6,29.413 38.252,39.097
NetC15.L3_1 on Top Layer "NONET_L-01_P-001" (solid, pour order 179): 23 vertices, not listed, extent 112.12,15.05 118.66,27.23
GND on Top Layer "NONET_L-01_P-001" (solid, pour order 274): 36.49,21.89 36.49,19.09 37.122,18.458 37.393,18.458 37.597,18.662 37.597,19.731 37.597,20.7 37.387,20.91 37.387,21.89
+3.3V_DCDC on Top Layer "NONET_L-01_P-001" (solid, pour order 273): 17 vertices, not listed, extent 30.5,19.88 36.91,27.56
+1.35V_DCDC on Top Layer "NONET_L-01_P-001" (solid, pour order 272): 23 vertices, not listed, extent 36.531,24.95 40.045,36.413
GND on Top Layer "NONET_L-01_P-001" (solid, pour order 265): 1.12,64.967 24.633,64.967 25.18,64.42 25.18,50.12 24.262,49.202 18.592,49.202 14.14,44.75 2,44.75 1.12,45.63
GND on Top Layer "NONET_L-01_P-001" (solid, pour order 267): 32 vertices, not listed, extent 1.122,1.02 17.31,14.08
GND on Top Layer "NONET_L-01_P-001" (solid, pour order 261): 50.306,39.839 50.307,38.943 54.687,38.943 55.324,39.58 61.73,39.58 63.774,41.624 63.774,43.699 63.093,44.38 61.407,44.38 59.128,42.101 55.355,42.101 54.231,42.101 54.231,40.127 53.943,39.839
GND on Top Layer "NONET_L-01_P-001" (solid, pour order 260): 23 vertices, not listed, extent 37.6,38.96 49.896,48.16
VCC_PLL on Top Layer "NONET_L-01_P-001" (solid, pour order 247): 45.691,36.358 46.632,36.358 46.737,36.253 47.199,36.253 48.4,37.454 48.4,38.352 51.301,38.352 51.321,38.333 51.321,37.341 49.791,35.811 45.755,35.811 45.556,36.01 45.556,36.223
PWR_BANK3435 on Top Layer "NONET_L-01_P-001" (solid, pour order 213): 18 vertices, not listed, extent 55.236,9.86 60.435,15.83
PWR_B35_FPGA on Top Layer "NONET_L-01_P-001" (solid, pour order 227): 61.035,10.07 61.035,12.441 61.193,12.599 62.892,12.598 63.029,12.461 63.029,11.494 61.95,10.414 61.95,10.07
PWR_B13_FPGA on Top Layer "NONET_L-01_P-001" (solid, pour order 216): 44.75,15.884 44.75,13.16 45.775,13.16 46.097,12.838 46.097,12.315 46.369,12.043 47.285,12.043 47.67,12.428 47.67,14.555 47.67,15.884
PWR_B34_FPGA on Top Layer "NONET_L-01_P-001" (solid, pour order 214): 55.24,16.5 55.24,17.34 55.24,18.03 55.443,18.233 57.053,18.233 57.22,18.066 57.22,17.85 56.239,16.869 56.239,16.506
+3.3V_USB_OTG on Top Layer "NONET_L-01_P-001" (solid, pour order 196): 24 vertices, not listed, extent 9.643,23.045 15.945,29.175
SD_IO_PWR on Top Layer "NONET_L-01_P-001" (solid, pour order 204): 21.12,50.93 21.5,50.55 22.32,50.55 22.53,50.76 22.53,52.98 21.4,54.11 21.12,54.11
+3.3V_DCDC on Top Layer "NONET_L-01_P-001" (solid, pour order 201): 19.588,7.161 19.738,7.31 21.58,7.31 21.81,7.08 21.81,6.05 20.87,5.11 19.588,5.11
PWR_B501_FPGA on Top Layer "NONET_L-01_P-001" (solid, pour order 199): 17.48,16.66 17.23,16.41 17.23,14.37 17.42,14.18 19.29,14.18 19.48,14.37 19.48,16.14 18.96,16.66
+3.3V_DCDC on Top Layer "NONET_L-01_P-001" (solid, pour order 198): 7.09,21.478 7.09,20.48 8.48,20.48 8.94,20.02 10.79,20.02 11.08,20.31 11.08,22.275 10.885,22.47 8.79,22.47 7.798,21.478
GND on Top Layer "NONET_L-01_P-001" (solid, pour order 195): 13.84,25.34 13.84,22.05 17.148,22.05 17.148,25.341
USB_VDDIO_PWR on Top Layer "NONET_L-01_P-001" (solid, pour order 194): 17 vertices, not listed, extent 11.802,17.23 20.46,20.4
+1.8V_USB_OTG on Top Layer "NONET_L-01_P-001" (solid, pour order 192): 18 vertices, not listed, extent 18.57,21.54 21.287,24.48
NetC17.L3_1 on Top Layer "NONET_L-01_P-001" (solid, pour order 186): 109.3,8.513 113.933,8.513 114.73,9.31 117.6,9.31 117.77,9.14 117.77,5.757 117.003,4.99 114.265,4.99 114.142,4.867 109.3,4.867
+3.3V_DCDC on Top Layer "NONET_L-01_P-001" (solid, pour order 187): 112.411,9.26 113.655,9.26 113.705,9.31 113.705,10.443 114.63,11.369 114.63,13.153 114.414,13.37 112.58,13.37 112.411,13.201
NetC13.L3_2 on Top Layer "NONET_L-01_P-001" (solid, pour order 185): 103.59,6.492 103.59,5.867 104.104,5.867 104.465,5.506 106.89,5.506 106.89,7.28 104.86,7.28 104.072,6.492
+5V_MAIN on Top Layer "NONET_L-01_P-001" (solid, pour order 184): 96.703,8.467 96.76,8.41 99.72,8.41 100.231,7.899 102.317,7.899 102.77,7.446 102.77,6.84 103.96,6.84 103.96,9.531 103.861,9.63 100.52,9.63 99.41,10.74 96.85,10.74 96.703,10.593
+1.35V_DCDC on Top Layer "NONET_L-01_P-001" (solid, pour order 183): 106.73,12.2 106.73,11.735 106.875,11.59 111.28,11.59 111.617,11.927 111.617,13.043 111.39,13.27 106.89,13.27 106.739,13.119
NetC16.L3_1 on Top Layer "NONET_L-01_P-001" (solid, pour order 182): 17 vertices, not listed, extent 98.69,11.59 106.32,23.055
NetC12.L3_2 on Top Layer "NONET_L-01_P-001" (solid, pour order 181): 99.362,28.48 98.737,28.48 98.737,27.54 98.376,27.179 98.376,24.864 98.539,24.701 100.15,24.701 100.15,26.931 99.362,27.719
+1.8V_DCDC on Top Layer "NONET_L-01_P-001" (solid, pour order 180): 116.1,18.66 116.1,17.06 115.828,16.788 114.478,16.788 114.232,16.541 114.232,15.128 114.31,15.05 115.82,15.05 116.82,14.05 117.5,14.05 118.69,15.24 118.69,18.61 118.49,18.81 116.25,18.81
NetC11.L3_2 on Top Layer "NONET_L-01_P-001" (solid, pour order 178): 112.101,30.352 112.101,29.727 112.615,29.727 112.976,29.366 118.31,29.366 118.67,29.726 118.67,31.14 113.514,31.14 112.726,30.352
+5V_RELE on Top Layer "NONET_L-01_P-001" (solid, pour order 173): 108.71,56.03 106.12,56.03 105.01,54.92 101.67,54.92 101.075,54.325 101.075,51.965 101.65,51.39 104.96,51.39 106.01,50.34 108.89,50.34 110.01,51.46 110.01,54.73
NetC14.L3_1 on Top Layer "NONET_L-01_P-001" (solid, pour order 174): 33 vertices, not listed, extent 111.66,34.41 118.49,50.03
+1.0V_DCDC on Top Layer "NONET_L-01_P-001" (solid, pour order 177): 116.49,35.946 116.49,34.475 115.955,33.94 113.54,33.94 113.35,33.75 113.35,33.035 113.707,32.678 118.078,32.678 118.64,33.24 118.64,35.9 118.45,36.09 116.634,36.09
NetC10.L3_2 on Top Layer "NONET_L-01_P-001" (solid, pour order 176): 108.49,42.866 108.49,42.241 109.004,42.241 109.365,41.88 111.588,41.88 111.78,42.072 111.78,43.44 109.42,43.44 108.845,42.866
+5V_FROM_USB on Top Layer "NONET_L-01_P-001" (solid, pour order 171): 14.04,14.78 14.04,13.38 14.32,13.1 16.283,13.1 16.712,13.529 16.712,16.888 16.65,16.95 15.665,16.95 15.54,16.825 15.54,15.13 15.37,14.96 14.22,14.96
+5V_USB_UART on Top Layer "NONET_L-01_P-001" (solid, pour order 170): 12.08,10.27 12.08,16.8 12.23,16.95 14.9,16.95 15.06,16.79 15.06,15.46 14.87,15.27 13.78,15.27 13.6,15.09 13.6,10.36 13.411,10.17 12.18,10.17
+1.35V_DCDC on Middle Layer 4 "NONET_L-01_P-001" (solid, pour order 255): 25 vertices, not listed, extent 28.12,4.42 111.62,17.5
+1.35V_RAM_PS on Middle Layer 4 "NONET_L-01_P-001" (solid, pour order 256): 31.062,15.182 25.62,9.74 25.62,4.57 25.77,4.42 27.701,4.42 27.79,4.509 27.79,7.573 33.271,13.054 33.271,15.268 33.077,15.462 31.342,15.462
no net on Top Overlay "NONET_L-01_P-001" (solid): 59.075,33.807 60.07,33.807 60.07,35.807 59.07,35.807
no net on Top Overlay "NONET_L-01_P-001" (solid): 59.055,29.707 60.055,29.707 60.055,27.707 59.055,27.707
no net on Top Overlay "NONET_L-01_P-001" (solid): 59.075,24.64 61.075,24.64 61.075,23.64 59.075,23.64
no net on Top Overlay "NONET_L-01_P-001" (solid): 58.86,13.66 60.86,13.66 60.86,11.66 58.86,11.66
no net on Top Overlay "NONET_L-01_P-001" (solid): 58.86,17.66 60.86,17.66 60.86,15.66 58.86,15.66
no net on Top Overlay "NONET_L-01_P-001" (solid): 63.98,64.2 65.98,64.2 65.98,62.2 63.98,62.2
no net on Top Overlay "NONET_L-01_P-001" (solid): 59.98,64.2 61.98,64.2 61.98,62.2 59.98,62.2
VCC_PLL on Middle Layer 5 (PWR) "NONET_L-01_P-001" (solid, pour order 246): 23 vertices, not listed, extent 44.568,30.122 47.853,36.342
+1.8V_DCDC on Middle Layer 5 (PWR) "NONET_L-01_P-001" (solid, pour order 224): 101 vertices, not listed, extent 17.982,3.42 118.54,60.08
+1.35V_DCDC on Middle Layer 5 (PWR) "NONET_L-01_P-001" (solid, pour order 253): 46 vertices, not listed, extent 33.748,13.27 44.667,36.027
PWR_B13_FPGA on Middle Layer 5 (PWR) "NONET_L-01_P-001" (solid, pour order 222): 22 vertices, not listed, extent 38.1,10.03 50.049,23.01
PWR_B501_FPGA on Middle Layer 5 (PWR) "NONET_L-01_P-001" (solid, pour order 221): 56 vertices, not listed, extent 17.36,10.03 57.03,64.09
PWR_B35_FPGA on Middle Layer 5 (PWR) "NONET_L-01_P-001" (solid, pour order 226): 30 vertices, not listed, extent 51.758,11.323 63.045,34.203
VREF_DDR_M on Middle Layer 5 (PWR) "NONET_L-01_P-001" (solid, pour order 234): 25 vertices, not listed, extent 23.945,18.484 36.026,32.402
+1.35V_RAM_PL on Middle Layer 5 (PWR) "NONET_L-01_P-001" (solid, pour order 236): 46 vertices, not listed, extent 60.153,25.077 83.098,62.03
+1.35V_DCDC on Middle Layer 5 (PWR) "NONET_L-01_P-001" (solid, pour order 237): 36 vertices, not listed, extent 59.06,9.07 111.608,64.73
MEM1_BUS.VREF_FPGA on Middle Layer 5 (PWR) "NONET_L-01_P-001" (solid, pour order 235): 33 vertices, not listed, extent 62.232,27.413 81.96,39.7
+1.35V_RAM_PS on Middle Layer 5 (PWR) "NONET_L-01_P-001" (solid, pour order 254): 62 vertices, not listed, extent 22.53,13.27 33.748,39.75
+3.3V_USB_OTG on Middle Layer 5 (PWR) "NONET_L-01_P-001" (solid, pour order 251): 15.377,27.345 15.561,27.161 15.79,27.161 15.977,27.348 15.977,30.434 17.407,31.863 17.407,32.146 17.27,32.283 16.967,32.283 16.834,32.15 15.377,30.693
PWR_RAM_FORM on Middle Layer 5 (PWR) "NONET_L-01_P-001" (solid, pour order 238): 64.14,61.631 64.14,60.71 66.02,58.83 85.13,58.83 93.8,50.16 99.8,50.16 100.12,50.48 100.12,53.84 99.76,54.2 94.573,54.2 86.803,61.97 64.479,61.97
MEM0_BUS.VREF_PSM on Middle Layer 5 (PWR) "NONET_L-01_P-001" (solid, pour order 230): 21 vertices, not listed, extent 38.073,21.902 45.514,29.975
PWR_B34_FPGA on Middle Layer 5 (PWR) "NONET_L-01_P-001" (solid, pour order 225): 34 vertices, not listed, extent 51.98,16.83 59.397,25.41
+3.3V_DCDC on Internal Plane 2 (+1.0V) "NONET_L-01_P-001" (solid, pour order 244): 151 vertices, not listed, extent 5.606,2.52 114.664,64.11
+1.0V_DCDC on Internal Plane 2 (+1.0V) "NONET_L-01_P-001" (solid, pour order 240): 80 vertices, not listed, extent 40.192,17.53 118.618,57.06
PWR_RAM_FORM on Middle Layer 1 "NONET_L-01_P-0010" (solid, pour order 242): 22 vertices, not listed, extent 56.948,8.85 100.1,54.08
+1.8V_DCDC on Middle Layer 1 "NONET_L-01_P-001" (solid, pour order 249): 20 vertices, not listed, extent 32.072,43.46 57.183,61.97
GND on Internal Plane 1 (GND) "NONET_L-01_P-001" (solid, pour order 259): 1.12,64.985 1.12,1.015 118.985,1.015 118.985,64.985
GND on Internal Plane 3 (GND) "NONET_L-01_P-001" (solid, pour order 258): 1.12,64.985 1.12,1.015 118.985,1.015 118.985,64.985
no net on Top Solder "NONET_L-01_P-001" (solid): 116.812,33.304 cw(c117.284,33.304) 117.284,33.776 cw(c117.272,33.317) 117.731,33.304 cw(c117.304,33.286) 117.321,32.859 cw(c117.289,33.336)
no net on Top Solder "NONET_L-01_P-001" (solid): 112.647,12.487 cw(c113.12,12.487) 113.12,12.96 cw(c113.108,12.5) 113.567,12.487 cw(c113.14,12.47) 113.157,12.042 cw(c113.125,12.52)
no net on Top Solder "NONET_L-01_P-001" (solid): 110.432,12.487 cw(c110.905,12.487) 110.905,12.96 cw(c110.892,12.5) 111.352,12.487 cw(c110.925,12.47) 110.942,12.042 cw(c110.91,12.52)
no net on Top Solder "NONET_L-01_P-001" (solid): 116.635,14.73 cw(c117.108,14.73) 117.108,15.202 cw(c117.095,14.743) 117.555,14.73 cw(c117.128,14.712) 117.145,14.285 cw(c117.112,14.762)
no net on Top Solder "NONET_L-01_P-001" (solid): 101.707,37.185 cw(c102.179,37.185) 102.179,37.658 cw(c102.167,37.198) 102.627,37.185 cw(c102.199,37.167) 102.217,36.74 cw(c102.184,37.217)
PWR_RAM_EXT on Middle Layer 3 "NONET_L-01_P-001" (solid, pour order 241): 37 vertices, not listed, extent 56.91,15.815 109.98,62.03

## Other copper
Top Layer:
  pour cut-out: 1.78,59.577 cw(c3.385,59.576) 4.99,59.577 cw(c3.385,59.576) 3.385,57.972 cw(c3.385,59.576)
  pour cut-out: 1.78,51.577 cw(c3.385,51.576) 4.99,51.577 cw(c3.385,51.576) 3.385,49.972 cw(c3.385,51.576)
  pour cut-out: 13.35,61.992 13.35,51.57 15.944,51.57 15.944,62.004
  pour cut-out: 22.762,57.627 22.762,56.871 22.788,56.845 22.996,57.053 23.2,57.053 23.2,57.521 23.147,57.574
  pour cut-out: 19.412,54.282 20.14,54.282 20.14,54.038 19.9,53.798 19.432,53.798
  pour cut-out: 15.62,58.6 15.62,57.21 15.763,57.067 16.42,57.067 16.42,58.277 16.573,58.43 16.486,58.516 16.486,59.469 15.843,59.469 15.805,59.431
  pour cut-out: 19.15,52.07 17.79,52.07 17.79,51.81 19.15,51.81
  pour cut-out: 20.72,62.03 20.72,60.67 20.98,60.67 20.98,62.03
  pour cut-out: 17.43,62.03 17.43,60.67 17.69,60.67 17.69,62.03

## Text inside footprints (layer, text, board x,y; h text height)
D1.L2: Top Overlay "Y" at 39.73,19.49 h0.8; Top Overlay "W" at 39.62,20.29 h0.8; Top Overlay "V" at 39.73,21.09 h0.8; Top Overlay "U" at 39.73,21.89 h0.8; Top Overlay "T" at 39.73,22.69 h0.8; Top Overlay "R" at 39.73,23.49 h0.8; Top Overlay "P" at 39.73,24.29 h0.8; Top Overlay "N" at 39.73,25.09 h0.8; Top Overlay "M" at 39.73,25.89 h0.8; Top Overlay "L" at 39.73,26.69 h0.8; Top Overlay "K" at 39.73,27.49 h0.8; Top Overlay "J" at 39.73,28.29 h0.8; Top Overlay "H" at 39.73,29.09 h0.8; Top Overlay "G" at 39.73,29.89 h0.8; Top Overlay "F" at 39.73,30.69 h0.8; Top Overlay "E" at 39.7,31.47 h0.8; Top Overlay "D" at 39.72,32.29 h0.8; Top Overlay "C" at 39.66,33.12 h0.8; Top Overlay "B" at 39.73,33.92 h0.8; Top Overlay "A" at 39.69,34.72 h0.8; Top Overlay "9" at 47.653,36.108 h0.8; Top Overlay "7" at 46.053,36.1 h0.8; Top Overlay "5" at 44.453,36.108 h0.8; Top Overlay "3" at 42.853,36.108 h0.8; Top Overlay "1" at 41.253,36.1 h0.8; Top Overlay "19" at 55.535,36.108 h0.8; Top Overlay "17" at 53.935,36.1 h0.8; Top Overlay "15" at 52.335,36.108 h0.8; Top Overlay "13" at 50.735,36.108 h0.8; Top Overlay "11" at 49.143,36.1 h0.8
D1.L7: Top Overlay "A" at 23.385,37.14 h0.5; Top Overlay "1" at 24.745,38.59 h0.5; Top Overlay "9" at 31.145,38.59 h0.5; Top Overlay "B" at 23.385,36.34 h0.5; Top Overlay "C" at 23.385,35.54 h0.5; Top Overlay "D" at 23.385,34.74 h0.5; Top Overlay "E" at 23.385,33.94 h0.5; Top Overlay "F" at 23.385,33.14 h0.5; Top Overlay "G" at 23.385,32.34 h0.5; Top Overlay "H" at 23.385,31.54 h0.5; Top Overlay "J" at 23.385,30.74 h0.5; Top Overlay "K" at 23.385,29.94 h0.5; Top Overlay "L" at 23.385,29.14 h0.5; Top Overlay "M" at 23.385,28.34 h0.5; Top Overlay "N" at 23.385,27.54 h0.5; Top Overlay "P" at 23.385,26.74 h0.5; Top Overlay "R" at 23.385,25.94 h0.5; Top Overlay "T" at 23.385,25.14 h0.5
D1.L9: Top Overlay "9" at 75.11,29.014 h1 r180; Top Overlay "8" at 75.91,29.014 h1 r180; Top Overlay "7" at 76.71,29.003 h1 r180; Top Overlay "3" at 79.93,29.014 h1 r180; Top Overlay "2" at 80.731,29.014 h1 r180; Top Overlay "1" at 81.53,29.014 h1 r180; Top Overlay "T" at 83.03,42.545 h1 r180; Top Overlay "R" at 83.03,41.705 h1 r180; Top Overlay "P" at 83.03,40.875 h1 r180; Top Overlay "N" at 83.03,40.135 h1 r180; Top Overlay "M" at 83.03,39.345 h1 r180; Top Overlay "L" at 83.03,38.555 h1 r180; Top Overlay "K" at 83.03,37.755 h1 r180; Top Overlay "J" at 83.032,36.934 h1 r180; Top Overlay "H" at 83.03,36.155 h1 r180; Top Overlay "G" at 83.03,35.324 h1 r180; Top Overlay "F" at 83.03,34.535 h1 r180; Top Overlay "E" at 83.03,33.735 h1 r180; Top Overlay "D" at 83.03,32.905 h1 r180; Top Overlay "C" at 83.03,32.124 h1 r180; Top Overlay "B" at 83.03,31.365 h1 r180; Top Overlay "A" at 83.03,30.505 h1 r180
K1.L8: Top Overlay "+" at 90.74,8.17 h2 r180; Top Overlay "-" at 90.59,2.86 h2 r180
K2.L8: Top Overlay "-" at 75.56,2.86 h2 r180; Top Overlay "+" at 75.71,8.17 h2 r180
SA3.L2: Top Overlay "ON" at 42.85,46.93 h0.8; Top Overlay "3" at 44.29,42.19 h0.8; Top Overlay "2" at 43.17,42.19 h0.8; Top Overlay "1" at 42.09,42.19 h0.8